# Altium PCB PCB-Thermostat.PcbDoc (part 3 of 4)
Units mil, origin at the board's own origin, x right, y up, seen from the top; angles counter-clockwise.
Board outline 3937.01 x 3543.31 mil, 4 copper layers (Top, PWR, GND, Bottom), stack 62.417 mil thick; 123 components, 131 nets, 527 pads, 279 vias.
Unrouted connection lines stored in the file: 2.
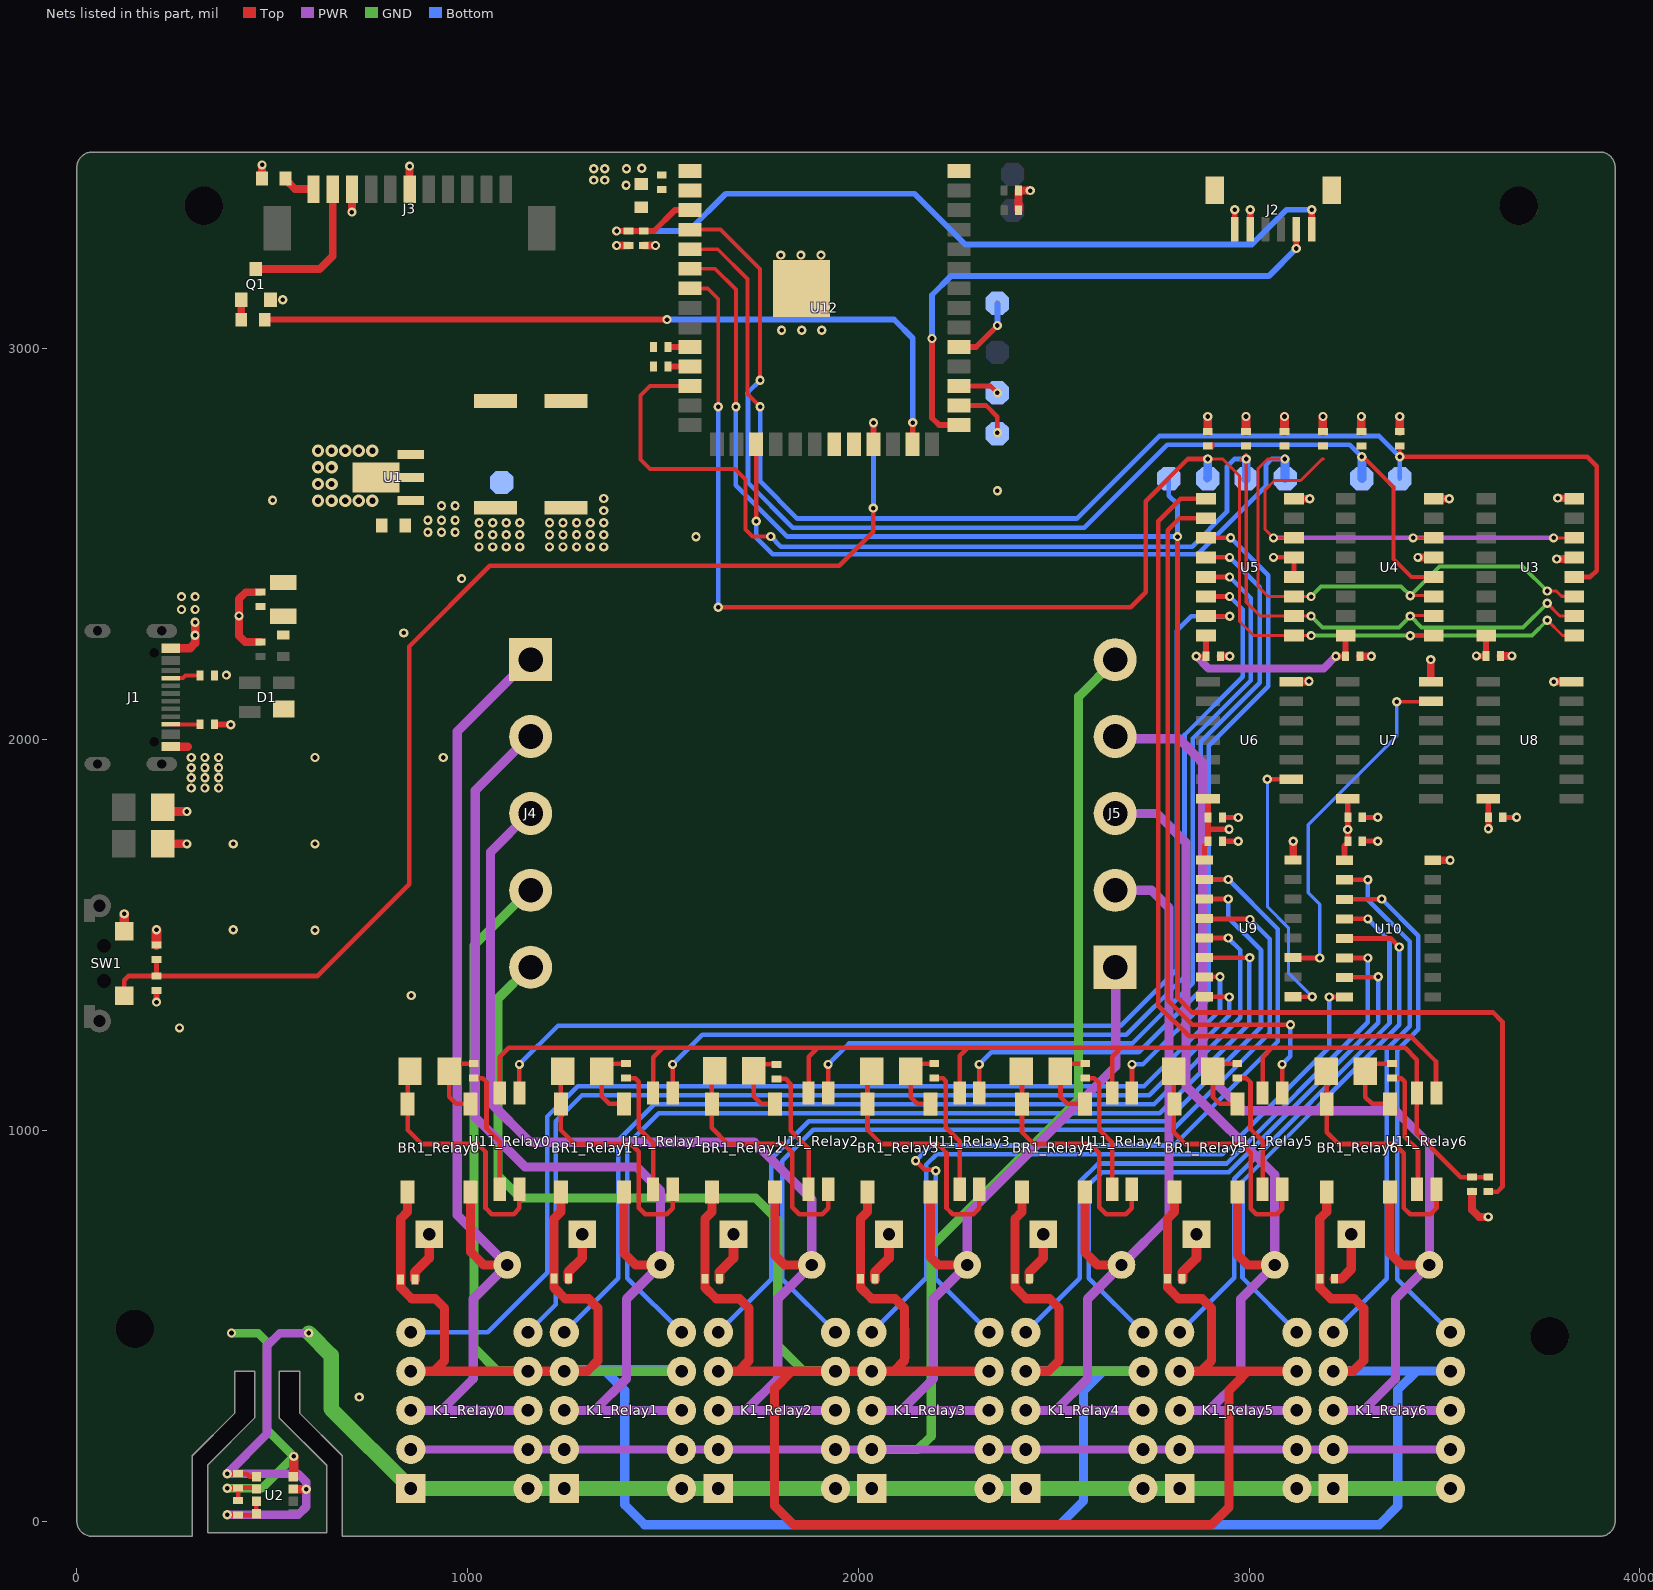
[diagram p4: the nets of this part, all layers, seen from the top]

## Via types
v1: diameter 23.62, hole 11.81, Top to Bottom, 261 vias
v2: diameter 31.5, hole 15.75, Top to Bottom, 14 vias
v3: diameter 23.62, hole 11.81, Top to Bottom, tented top, 4 vias

## Nets (pads, with @x,y where several pads share a name; then routed paths per layer and width w, separated by ;. In a path a pad name is that pad's centre, name@x,y a point inside that pad or via, vN(x,y) a via of type N, cw(c..) or ccw(c..) an arc to the next point about the centre after c; other vN are vias at no path point)
+3V3: C5.1 C6.1 C7.1 C8.1 C9.1 C10.1 C11.1 C12.1 C13.1 C14.1 C15.1 C16.1 C19.1 C20.1 J2.1 J3.3 K1_Relay0.1 K1_Relay0.10 K1_Relay1.1 K1_Relay1.10 K1_Relay2.1 K1_Relay2.10 K1_Relay3.1 K1_Relay3.10 K1_Relay4.1 K1_Relay4.10 K1_Relay5.1 K1_Relay5.10 K1_Relay6.1 K1_Relay6.10 P1.1 R4.2 R5.2 R6.2 R7.2 R8.2 R9.2 R10.2 R14.2 R15.2 R16.2 R19.2 R20.2 U1.3 U2.2 U2.5 U2.6 U2.8 U3.16 U4.16 U5.16 U6.14 U7.14 U8.14 U9.9 U10.9 U12.2 | length 6037.2
  Top w8: v1(384.64,16.13) v1@385.14,15.63 ; v1@384.64,120.13 v1@385.48,120.96 ; C7.1@411.8,120.96 C7.1@412.64,121.8 ; C8.1@412.14,15.63 C8.1@412.64,15.13
  Top w11.81: v1@385.14,15.63 C8.1@412.14,15.63 ; v1@385.48,120.96 C7.1@411.8,120.96 ; C8.1@412.64,15.13 455.64,15.13 U2.5@459.39,18.88 U2.6@459.39,50.38 ; C7.1@412.64,121.8 413.44,121 434.77,121 442.39,113.37 U2.8@459.39,113.37 U2.8@455.37,117.4
  Top w15: v3(2864.94,2213.13) C9.1@2889.94,2213.13 U5.16@2889.94,2266.29 ; U9.9@2886.59,1692.09 2886.59,1727.55 2895.45,1736.41 C15.1@2895.45,1739.91 2895.45,1770.25 ; U6.14@2895.45,1848.38 C12.1@2895.45,1800.6 2895.45,1770.25 ; v1(2948.96,1770.58) 2895.77,1770.58 2895.45,1770.25 ; J2.1@2963.57,3306.67 v1(2963.57,3356.37) ; v3(3222.29,2213.13) C10.1@3247.29,2213.13 U4.16@3247.29,2266.29 ; U10.9@3243.95,1691.09 3243.95,1727.77 3252.81,1736.63 C16.1@3252.81,1740.13 v1(3252.81,1769.81) C13.1@3252.81,1801.13 U7.14@3252.81,1848.38 ; v3(3581.94,2214.16) C11.1@3606.95,2214.16 U3.16@3606.94,2266.29 ; U8.14@3612.45,1848.38 C14.1@3612.45,1801.13 3612.54,1801.03 v1@3612.54,1772.22
  Top w16: v1(203.64,1328.13) R19.2@203.64,1357.83
  Top w19.68: v1(1381.37,3264.63) R14.2@1411.64,3264.63
  Top w20: R20.2@474,3436 v1(474,3471) ; v1(703.94,3350.06) J3.3@703.94,3409 ; R15.2@2410.14,3355.12 R16.2@2410.14,3405.12 v1(2439.9,3405.12) ; R10.2@3570.64,843.02 3570.64,796.46 3588.65,778.45 v1(3612.45,778.45)
  Top w22: U2.2@563.63,81.68 v1@587.06,81.68 ; R5.2@2894.64,2788.47 v1(2894.64,2826.88) ; R6.2@2992.37,2788.47 v1(2992.37,2826.88) ; R7.2@3090.8,2788.47 v1(3090.8,2826.88) ; R4.2@3189.22,2788.47 v1(3189.22,2826.88) ; R9.2@3287.65,2788.47 v1(3287.65,2826.88) ; R8.2@3386.07,2788.47 v1(3386.07,2826.88)
  PWR w20: v3(2864.94,2213.13) 2896.13,2181.94 3191.1,2181.94 v3(3222.29,2213.13)
  PWR w22: v1@385.08,16.13 385.39,16.44 566.95,16.44 587.13,36.61 v1(587.13,81.62) 586.82,81.93 586.82,99.95 565.64,121.13 v1(384.64,121.13) 486.22,222.71 486.22,447.75 519.6,481.13 v1(593.64,481.13)
  GND w39.37: v1(593.64,481.13) 650.64,424.13 650.64,287.13 K1_Relay0.1@854.64,83.13 K1_Relay0.10@1154.64,83.13 K1_Relay1.1@1247.64,83.13 K1_Relay1.10@1547.64,83.13 K1_Relay2.1@1641.64,83.13 K1_Relay2.10@1941.64,83.13 K1_Relay3.1@2034.64,83.13 K1_Relay3.10@2334.64,83.13 K1_Relay4.1@2428.64,83.13 K1_Relay4.10@2728.64,83.13 K1_Relay5.1@2822.64,83.13 K1_Relay5.10@3122.64,83.13 K1_Relay6.1@3215.64,83.13 K1_Relay6.10@3515.64,83.13
  Bottom w15: v3(3581.94,2214.16) v3@3583.24,2212.86
  other v1: 3612.64,1772.13 1029.36,2493.25 1064.11,2493.25 1098.86,2493.25 1133.61,2493.25 1029.36,2524.25 1064.11,2524.25 1098.86,2524.25 1133.61,2524.25 1029.36,2555.25 1064.11,2555.25 1098.86,2555.25 1133.61,2555.25 1323,3432.13 1351,3432.13 1323,3461.13 1351,3461.13
+5V: C4.1 F1.2 U1.2
  other v2: 617.22,2611.52 651.97,2611.52 686.72,2611.52 721.47,2611.52 756.22,2611.52 617.22,2654.18 651.97,2654.18 617.22,2696.85 651.97,2696.85 617.22,2739.52 651.97,2739.52 686.72,2739.52 721.47,2739.52 756.22,2739.52
B: BR1_Relay3.4 J5.1 K1_Relay3.3 K1_Relay3.8 RV1_Relay3.2 | length 1931.1
  Top w23.62: BR1_Relay3.4@2184.75,842.63 2184.75,675.01 2204.38,655.39 RV1_Relay3.2@2278.64,655.39 RV1_Relay3.2@2278.64,655.17
  PWR w23.62: K1_Relay3.3@2034.64,283.13 2135.55,283.13 K1_Relay3.8@2334.64,283.13 ; 2110.64,283.13 2191.64,364.13 2191.64,568.39 RV1_Relay3.2@2278.64,655.39 2278.64,783.73 2658.64,1163.73 J5.1@2658.64,1417.43
BLA: J3.1 R20.1 | length 84.2
  Top w20: R20.1@534,3436 534,3433.5 558.5,3409 J3.1@605.51,3409
BLK: J3.2 Q1.3 | length 381.8
  Top w20: Q1.3@458,3204.37 621.26,3204.37 654.72,3237.83 J3.2@654.72,3409
BR1_Relay0: BR1_Relay0.1 C17_Relay0.2 R13_Relay0.2 | length 196.1
  Top w11.81: BR1_Relay0.1@1007.75,1067.83 970.87,1067.83 952.64,1086.06 C17_Relay0.2@952.64,1151.13 972.14,1170.63 R13_Relay0.2@1012.93,1170.63
BR1_Relay1: BR1_Relay1.1 C17_Relay1.2 R13_Relay1.2 | length 198.9
  Top w11.81: BR1_Relay1.1@1400.46,1067.83 1363,1067.83 1343.64,1087.19 C17_Relay1.2@1343.64,1151.13 1363.14,1170.63 R13_Relay1.2@1405.64,1170.63
BR1_Relay2: BR1_Relay2.1 C17_Relay2.2 R13_Relay2.2 | length 192.1
  Top w11.81: BR1_Relay2.1@1786.75,1067.83 1751.73,1067.83 1732.64,1086.92 C17_Relay2.2@1732.64,1152.13 1749.14,1168.63 R13_Relay2.2@1790.64,1168.63
BR1_Relay3: BR1_Relay3.1 C17_Relay3.2 R13_Relay3.2 | length 193.3
  Top w11.81: BR1_Relay3.1@2184.75,1067.83 2151.38,1067.83 2134.64,1084.57 C17_Relay3.2@2134.64,1151.13 2134.64,1153.89 2151.38,1170.63 R13_Relay3.2@2194.64,1170.63
BR1_Relay4: BR1_Relay4.1 C17_Relay4.2 R13_Relay4.2 | length 207
  Top w11.81: BR1_Relay4.1@2580.46,1067.83 2534.97,1067.83 2517.64,1085.16 2517.64,1151.13 2537.14,1170.63 R13_Relay4.2@2580.64,1170.63
BR1_Relay5: BR1_Relay5.1 C17_Relay5.2 R13_Relay5.2 | length 205.8
  Top w11.81: R13_Relay5.2@2969.64,1170.63 2927.43,1170.63 2907.93,1151.13 2907.93,1085.16 2925.26,1067.83 BR1_Relay5.1@2970.75,1067.83
BR1_Relay6: BR1_Relay6.1 C17_Relay6.2 R13_Relay6.2 | length 212
  Top w11.81: BR1_Relay6.1@3360.46,1067.83 3314.97,1067.83 3297.64,1085.16 C17_Relay6.2@3297.64,1151.13 3317.14,1170.63 R13_Relay6.2@3365.64,1170.63
BR2_Relay0: BR1_Relay0.2 C17_Relay0.1 U11_Relay0.2 | length 667.8
  Top w11.81: C17_Relay0.1@852.64,1151.13 846.33,1144.82 846.33,1000.93 882.17,965.1 1025.66,965.1 1045.88,944.88 1045.88,801.33 1062.08,785.13 1117.69,785.13 1132.64,800.08 U11_Relay0.2@1132.64,849.13
BR2_Relay1: BR1_Relay1.2 C17_Relay1.1 U11_Relay1.2 | length 667.8
  Top w11.81: C17_Relay1.1@1244.75,1151.13 1238.45,1144.82 1238.45,1000.93 1274.28,965.1 1417.77,965.1 1437.99,944.88 1437.99,801.33 1454.2,785.13 1509.8,785.13 1524.75,800.08 U11_Relay1.2@1524.75,849.13
BR2_Relay2: BR1_Relay2.2 C17_Relay2.1 U11_Relay2.2 | length 674.6
  Top w11.81: C17_Relay2.1@1632.64,1152.13 1625.33,1144.82 BR1_Relay2.2@1625.33,1067.83 1625.33,1006.1 1666.33,965.1 1807.84,965.1 1830.52,942.42 1830.52,803.57 1848.97,785.13 1907.8,785.13 1922.75,800.08 U11_Relay2.2@1922.75,849.13
BR2_Relay3: BR1_Relay3.2 C17_Relay3.1 U11_Relay3.2 | length 666.3
  Top w11.81: C17_Relay3.1@2029.75,1151.13 2023.45,1144.82 2023.45,1000.93 2059.28,965.1 2202.77,965.1 2225.81,942.06 2225.81,801.19 2241.88,785.13 2294.8,785.13 2309.75,800.08 U11_Relay3.2@2309.75,849.13
BR2_Relay4: BR1_Relay4.2 C17_Relay4.1 U11_Relay4.2 | length 670.3
  Top w11.81: C17_Relay4.1@2419.04,1161.54 BR1_Relay4.2@2419.04,1067.83 2419.04,995.34 2449.28,965.1 2592.77,965.1 2616.64,941.24 2616.64,802.91 2634.42,785.13 2684.8,785.13 2699.75,800.08 U11_Relay4.2@2699.75,849.13
BR2_Relay5: BR1_Relay5.2 C17_Relay5.1 U11_Relay5.2 | length 660.2
  Top w11.81: C17_Relay5.1@2807.64,1151.13 2807.64,994.63 2837.17,965.1 2981.64,965.1 3004.28,942.46 3004.28,799.19 3018.34,785.13 3070.89,785.13 3084.75,798.99 U11_Relay5.2@3084.75,849.13
BR2_Relay6: BR1_Relay6.2 C17_Relay6.1 U11_Relay6.2 | length 660.3
  Top w11.81: C17_Relay6.1@3199.04,1150.42 3199.04,995.34 3229.28,965.1 3372.77,965.1 3396.44,941.44 3396.44,801.15 3412.47,785.13 3464.8,785.13 3479.75,800.08 U11_Relay6.2@3479.75,849.13
C: J5.5 K1_Relay0.2 K1_Relay0.9 K1_Relay1.2 K1_Relay1.9 K1_Relay2.2 K1_Relay2.9 K1_Relay3.2 K1_Relay3.9 K1_Relay4.2 K1_Relay4.9 K1_Relay5.2 K1_Relay5.9 K1_Relay6.2 K1_Relay6.9 | length 5010.5
  PWR w20: K1_Relay0.2@854.64,183.13 K1_Relay0.9@1154.64,183.13 K1_Relay1.2@1247.64,183.13 K1_Relay1.9@1547.64,183.13 K1_Relay2.2@1641.64,183.13 K1_Relay2.9@1941.64,183.13 K1_Relay3.2@2034.64,183.13 K1_Relay3.9@2334.64,183.13 K1_Relay4.2@2428.64,183.13 K1_Relay4.9@2728.64,183.13 K1_Relay5.2@2822.64,183.13 K1_Relay5.9@3122.64,183.13 K1_Relay6.9@3515.64,183.13
  GND w23.62: K1_Relay3.2@2034.64,183.13 2152.99,183.13 2186.64,216.78 2186.64,702.13 2563.91,1079.4 2563.91,2110.1 J5.5@2658.64,2204.83
CS: P13.1 U12.31 | length 177.6
  Top w15: U12.31@2257.87,3005.12 2301.12,3005.12 v1(2356,3060)
  Bottom w15: P13.1@2355.65,3116.64 2355.82,3116.47 2355.82,3060.18 v1(2356,3060)
E3: R4.1 U3.6 U4.6 U5.6 | length 1187.5
  Top w8: U5.6@3115.14,2516.29 v1(3062.65,2516.29) 3041.32,2537.62 3041.32,2639.13 3065.32,2663.13 3132.22,2663.13 3187.41,2718.32 3189.91,2718.32 ; v1(3420,2516.29) U4.6@3472.49,2516.29 ; v1(3779.65,2516.29) U3.6@3832.14,2516.29
  PWR w12: v1(3062.65,2516.29) v1(3420,2516.29) v1(3779.65,2516.29)
EN_ESP: C18.2 J2.6 R14.1 U12.3 | length 2171.1
  Top w15: v1(1381.37,3301.63) R14.1@1411.64,3301.63 C18.2@1450.64,3301.63 1477.05,3301.63 1530.54,3355.12 U12.3@1568.9,3355.12 U12.3@1567.27,3356.75
  Top w16: J2.6@3160.43,3306.67 v1(3160.43,3356.32)
  Bottom w15: v1(1381.37,3301.63) 1565.59,3301.63 1661.03,3397.07 2143.88,3397.07 2273.97,3266.97 3006.86,3266.97 3096.21,3356.32 v1(3160.43,3356.32)
ESP_RXD: R18.2
ESP_TXD: R17.2
G: BR1_Relay1.4 J4.2 K1_Relay1.3 K1_Relay1.8 RV1_Relay1.2 | length 2778.1
  Top w23.62: BR1_Relay1.4@1400.46,842.63 1400.46,685.31 1430.38,655.39 RV1_Relay1.2@1493.64,655.39
  PWR w23.62: J4.2@1157.64,2007.98 1019.64,1869.98 1019.64,1033.58 1147.21,906.02 1432.75,906.02 1493.64,845.13 RV1_Relay1.2@1493.64,655.39 1406.64,568.39 1406.64,364.13 1325.64,283.13 ; K1_Relay1.3@1247.64,283.13 K1_Relay1.8@1547.64,283.13
GND: C1.2 C2.2 C3.2 C4.2 C5.2 C6.2 C7.2 C8.2 C9.2 C10.2 C11.2 C12.2 C13.2 C14.2 C15.2 C16.2 C18.1 C19.2 C20.2 C21.2 D1.1 J1.A1/B12 J1.B1/A12 J2.2 J2.MP1 J2.MP2 J3.6 Q1.2 R1.1 R2.1 R3.1 SW1.2 U1.1 U2.1 U2.7 U3.5 U3.8 U4.5 U4.8 U5.4 U5.5 U5.8 U6.7 U7.7 U8.7 U9.8 U10.8 U12.1 U12.40 U12.41 | length 2405.1
  Top w8: U3.5@3827.97,2462.13 U3.5@3832.14,2466.29 ; U3.8@3830.3,2618.13 U3.8@3832.14,2616.29
  Top w11.81: v1(384.64,84.13) 384.98,84.46 412.3,84.46 C7.2@412.64,84.8 ; C8.2@412.64,52.13 C7.2@412.64,84.8 ; U2.7@459.39,81.87 456.47,84.8 C7.2@412.64,84.8 ; v1(3062.65,2466.29) U5.5@3115.14,2466.29 U5.4@3115.14,2416.29 ; U7.7@3444.07,2148.38 3458.73,2148.38 U7.7@3464.64,2154.28 ; v1@3776.64,2146.13 v1@3777.76,2147.25 ; U8.7@3798.4,2148.38 3800.44,2148.38 3800.66,2148.17 U8.7@3800.66,2147.04 ; U8.7@3800.44,2147.25 U8.7@3800.66,2147.04 ; U8.7@3800.66,2146.13 U8.7@3800.66,2147.04
  Top w13: C15.2@2932.45,1739.91 v1(2972.64,1739.91) ; C12.2@2932.45,1800.6 v1(2972.64,1800.6) ; C16.2@3289.81,1740.13 v1(3329.38,1740.13) ; C13.2@3289.81,1801.13 v1(3329.38,1801.13) ; C14.2@3649.45,1801.13 v1(3684.89,1801.13)
  Top w16: R3.1@352.64,2039.13 353.26,2038.5 393.32,2038.5 v1(393.95,2037.87) ; J2.2@3002.94,3306.67 v1(3002.94,3356.32)
  Top w19.68: C18.1@1450.64,3264.63 v1(1480.9,3264.63) ; U6.7@3108.05,2148.38 3108.42,2148.75 3153.26,2148.75 v1(3153.64,2149.13) ; U9.8@3112.97,1694.06 v1(3112.97,1739.91) ; U5.8@3115.14,2616.29 v1(3155.29,2616.29) ; v1(3432.33,2466.29) U4.5@3472.49,2466.29 ; U7.7@3465.4,2148.38 v1(3465.4,2204.87) ; U10.8@3470.33,1691.09 v1(3514.64,1691.13) ; U4.8@3472.49,2616.29 v1(3512.65,2616.29) ; v1@3780.21,2148.38 U8.7@3798.4,2148.38 ; v1(3787.81,2462.13) U3.5@3827.97,2462.13 ; v1(3790.14,2618.13) U3.8@3830.3,2618.13 ; U8.7@3800.44,2148.38 U8.7@3825.05,2148.38
  Top w20: C3.2@470.08,2249.96 431.02,2249.96 414.96,2266.02 v1(414.96,2316.63) 414.96,2360.12 432.01,2377.17 469.92,2377.17 C2.2@470.08,2377.32 ; J3.6@851.57,3409 v1(851.57,3467.94) ; C9.2@2926.94,2213.13 v1(2950.91,2213.13) ; C10.2@3284.29,2213.13 v1(3313.24,2213.13) ; C11.2@3643.95,2214.16 v1(3672.88,2214.16)
  Top w22: R1.1@219.64,1733.13 v1(281.64,1733.13) ; C1.2@219.64,1847.13 C1.2@230.64,1836.13 ; C1.2@230.64,1816.13 v1(281.64,1816.13) ; J1.B1/A12@239.75,1982.12 283.65,1982.12 ; J1.A1/B12@239.75,2234.09 289.75,2234.11 302.64,2246.99 v1(302.64,2267.13) v1@302.64,2295.13
  Top w25: SW1.2@120.93,1514.03 v1(120.93,1553.96) ; C21.2@203.64,1474.13 v3(203.64,1513.13) ; U2.1@554.89,114.38 v1(554.89,165.37)
  GND w22: v1(384.64,84.13) 473.65,84.13 v1(554.89,165.37) 486.64,233.62 486.64,458.13 463.64,481.13 v1(395.67,481.13)
  other v1: 722.64,317.13 262.64,1262.13 855.64,1345.13 609.58,1512.13 400.46,1513.13 400.46,1733.13 609.58,1733.13 292.64,1876.13 327.64,1876.13 362.64,1876.13 292.64,1902.13 327.64,1902.13 362.64,1902.13 292.64,1928.13 327.64,1928.13 362.64,1928.13 292.64,1954.13 327.64,1954.13 362.64,1954.13 609.58,1954.13 937.64,1954.13 3779.84,2148 382.64,2165.13 836.64,2273.13 302.64,2300.13 267.64,2333.13 302.64,2333.13 267.64,2366.13 302.64,2366.13 984.64,2412.13 1209.56,2493.25 1244.31,2493.25 1279.06,2493.25 1313.81,2493.25 1348.56,2493.25 1584.64,2519.13 1209.56,2524.25 1244.31,2524.25 1279.06,2524.25 1313.81,2524.25 1348.56,2524.25 898.47,2530.52 933.22,2530.52 967.97,2530.52 1209.56,2555.25 1244.31,2555.25 1279.06,2555.25 1313.81,2555.25 1348.56,2555.25 898.47,2561.52 933.22,2561.52 967.97,2561.52 1348.56,2586.25 933.22,2598.52 967.97,2598.52 500.87,2612.65 1348.56,2617.25 2356,2637.13 1803.69,3047.99 1855.19,3047.99 1906.69,3047.99 527,3125.63 1801.64,3240.13 1853.14,3240.13 1904.64,3240.13 1405.64,3419.13 1406.64,3461.13 1445.64,3462.13
GPIO4: P5.1 R9.1 U4.4 U12.4 | length 2974.9
  Top w10: U12.4@1568.9,3305.12 1647.65,3305.12 1748.64,3204.13 v1(1748.64,2919.84) ; v1(3288.34,2724.13) 3291.65,2724.13 3369.64,2646.14 3369.64,2462.38 3415.73,2416.29 U4.4@3472.49,2416.29
  Bottom w12: v1(1748.64,2919.84) 1717.64,2888.84 1717.64,2657.13 1832.68,2542.08 2577.74,2542.08 2790.43,2754.76 3257.7,2754.76 v1(3288.34,2724.13)
  Bottom w22: P5.1@3289.07,2667.9 v1@3289.07,2722.95
GPIO5: P6.1 R8.1 U3.4 U12.5 | length 3412.2
  Top w10: U12.5@1568.9,3255.12 1640.36,3255.12 1716.54,3178.94 1716.54,2884.23 v1(1748.64,2852.13)
  Top w12: v1@3386.07,2729.28 v1(3386.07,2724.13) 3865.29,2724.13 3889.64,2699.78 3889.64,2432.7 3873.23,2416.29 U3.4@3832.14,2416.29 ; 3386.07,2736.13 3386.07,2734.44 v1@3391.23,2729.28
  Bottom w12: v1(1748.64,2852.13) 1748.64,2660.7 1843.65,2565.69 2559.42,2565.69 2770.58,2776.85 3333.35,2776.85 v1(3386.07,2724.13) P6.1@3386.07,2667.9
GPIO6: P7.1 R11.2 U12.6 | length 4470.9
  Top w10: U12.6@1568.9,3205.12 1633.65,3205.12 1686.64,3152.13 v1(1686.64,2852.13)
  Top w11.81: 2817.09,2506.25 2817.09,1338.95 2854.51,1301.53 3625.1,1301.53 3648.64,1277.99 3648.64,855.72 3635.94,843.02 R11.2@3612.45,843.02
  Bottom w12: v1(1686.64,2852.13) 1686.64,2651.13 1818.08,2519.68 v1(2817.09,2519.68) 2817.09,2601.91 2794.64,2624.36 P7.1@2794.64,2667.9
GPIO7: P2.1 R5.1 U3.1 U4.1 U5.1 U12.7 | length 3911.5
  Top w8: v1(2894.33,2718.32) 2932.9,2718.32 2975.68,2675.53 2975.68,2302.4 3011.79,2266.29 U5.1@3115.14,2266.29 ; U5.1@3115.3,2266.13 v1(3158.89,2266.13) ; v1(3412.85,2266.09) 3472.29,2266.09 U4.1@3472.49,2266.29 ; v1(3763.22,2305.46) 3802.39,2266.29 U3.1@3832.14,2266.29
  Top w10: U12.7@1568.9,3155.12 1614.65,3155.12 1641.64,3128.13 v1(1641.64,2852.13)
  Top w12: v1@1641.37,2338.58 v1(1641.64,2338.58) 2696.89,2338.58 2735.85,2377.54 2735.85,2610.34 2843.83,2718.32 v1(2894.33,2718.32) ; R5.1@2905.64,2749.13 R5.1@2905.64,2755.13
  GND w10: v1@3158.92,2266.09 v1(3412.85,2266.09) 3723.85,2266.09 v1(3763.22,2305.46)
  Bottom w12: v1(1641.64,2338.58) v1(1641.64,2852.13)
  Bottom w22: P2.1@2892.98,2669.24 2894.48,2670.74 2894.48,2718.16 v1(2894.33,2718.32)
GPIO8: P3.1 R6.1 U3.2 U4.2 U5.2 U12.12 | length 3613.8
  Top w8: v1(2993.06,2718.32) 2993.06,2351.7 3028.47,2316.29 U5.2@3115.14,2316.29 ; U5.2@3115.3,2316.13 v1(3158.89,2316.13) ; v1@3412.85,2317.28 3471.51,2317.28 U4.2@3472.49,2316.29 ; v1(3763.24,2348.77) 3795.72,2316.29 U3.2@3832.14,2316.29
  Top w10: U12.12@1568.9,2905.12 1467.01,2905.12 1442.64,2880.75 1442.64,2717.12 1466.93,2692.83 1684.17,2692.83 1711,2666 1711,2537.69 1728.69,2520 v1(1776,2520) ; 2980.37,2715.44 2980.37,2716.13 v1@2987.81,2723.57 ; v1@2992.37,2728.13 v1@2987.81,2723.57 ; v1(2993.06,2718.32) v1@2987.81,2723.57
  GND w10: v1(3158.89,2316.13) 3187.77,2287.25 3383.97,2287.25 v1(3412.85,2316.13) 3441.72,2287.25 3701.72,2287.25 v1(3763.24,2348.77)
  Bottom w12: v1(1776,2520) 1802.09,2493.91 2854.3,2493.91 2943.48,2583.09 2943.48,2698.84 2962.95,2718.32 v1(2993.06,2718.32)
  Bottom w22: P3.1@2993.06,2665.47 2990.64,2667.9 2992.85,2670.11 2992.85,2718.1 v1(2993.06,2718.32)
GPIO9: P4.1 R7.1 U3.3 U4.3 U5.3 U12.17 | length 3138
  Top w8: v1(3091.8,2718.32) 3047.72,2718.32 3022.86,2693.46 3022.86,2392.47 3049.04,2366.29 U5.3@3115.14,2366.29 3115.3,2366.13 v1(3158.89,2366.13) ; v1(3412.85,2368.46) 3470.33,2368.46 U4.3@3472.49,2366.29 ; v1(3763.24,2380.27) 3786.5,2380.27 3799.94,2366.83 3831.6,2366.83 U3.3@3832.14,2366.29
  Top w12: v1(1738.58,2559.06) U12.17@1738.58,2755.9
  GND w10: v1(3158.89,2366.13) 3184.74,2391.98 3389.33,2391.98 v1(3412.85,2368.46) 3487.51,2443.13 3700.38,2443.13 v1(3763.24,2380.27)
  Bottom w12: v1(1738.58,2559.06) 1738.58,2516.42 1780.91,2474.09 2868.24,2474.09 3043.71,2649.56 3043.71,2703.66 3058.37,2718.32 v1(3091.8,2718.32)
  Bottom w22: v1(3091.8,2718.32) 3092.11,2718 3092.11,2668.43 P4.1@3092.64,2667.9
GPIO13: U12.21
GPIO14: U12.22
GPIO21: C21.1 R19.1 SW1.1 U12.23 | length 3165.4
  Top w10: U12.23@2038.58,2755.9 U12.23@2038.95,2756.27
  Top w12: SW1.1@120.93,1344.53 120.93,1384.37 131.39,1394.83 R19.1@203.64,1394.83 ; C21.1@203.64,1437.13 R19.1@203.64,1394.83 ; v1(2038.29,2592.52) 2038.29,2531.91 1951.05,2444.66 1057.14,2444.66 850.76,2238.28 850.76,1630.24 615.34,1394.83 R19.1@203.64,1394.83
  Top w15: U12.23@2038.95,2756.27 v1(2038.95,2811.02)
  Bottom w12: v1@2038.95,2592.52 v1(2038.95,2811.02)
GPIO48: R21.1 U12.25 | length 1949.9
  Top w15: R21.1@480.6,3075 v1(1510.47,3075) ; U12.25@2139.35,2755.9 v1(2139.35,2811.42)
  Bottom w15: v1(1510.47,3075) 2091.59,3075 2139.35,3027.24 v1(2139.35,2811.42)
IO0: J2.5 U12.27 | length 1423
  Top w15: v1(2188.58,3026.58) 2188.58,2823.42 2206.88,2805.12 U12.27@2257.87,2805.12 ; v1(3121.06,3256.96) J2.5@3121.06,3306.67
  Bottom w15: v1(2188.58,3026.58) 2188.58,3138.09 2236.66,3186.17 3050.26,3186.17 v1(3121.06,3256.96)
MISO: P11.1 U12.29 | length 105.5
  Top w12: U12.29@2257.87,2905.12 2338.28,2905.12 v1(2356,2887.4)
MOSI: P10.1 U12.28 | length 151.2
  Top w12: U12.28@2257.87,2855.12 2327.67,2855.12 2356,2826.79 v1(2356,2785.43)
NetC2_1: C2.1 F1.1 FB1.2
NetJ1_A5: J1.A5 R2.2 | length 78.7
  Top w10: J1.A5@239.75,2157.31 271.09,2157.31 277.9,2164.13 R2.2@315.64,2164.13
NetJ1_B5: J1.B5 R3.2 | length 75.9
  Top w10: J1.B5@239.75,2039.2 239.79,2039.17 315.6,2039.17 R3.2@315.64,2039.13
NetQ1_1: Q1.1 R21.2 | length 50.6
  Top w20: R21.2@420.6,3075 Q1.1@420.6,3125.63
NetR12_Relay0_1: R12_Relay0.1 RV1_Relay0.1 | length 130.9
  Top w25: R12_Relay0.1@865.62,618.13 865.62,636.84 901.64,672.86 RV1_Relay0.1@901.64,734.13
NetR12_Relay1_1: R12_Relay1.1 RV1_Relay1.1 | length 130.9
  Top w25: R12_Relay1.1@1257.62,618.13 1257.62,636.84 1293.64,672.86 RV1_Relay1.1@1293.64,734.13
NetR12_Relay2_1: R12_Relay2.1 RV1_Relay2.1 | length 130.9
  Top w25: R12_Relay2.1@1644.62,618.13 1644.62,636.84 1680.64,672.86 RV1_Relay2.1@1680.64,734.13
NetR12_Relay3_1: R12_Relay3.1 RV1_Relay3.1 | length 130.9
  Top w25: R12_Relay3.1@2042.62,618.13 2042.62,636.84 2078.64,672.86 RV1_Relay3.1@2078.64,734.13
NetR12_Relay4_1: R12_Relay4.1 RV1_Relay4.1 | length 130.9
  Top w25: R12_Relay4.1@2437.62,618.13 2437.62,636.84 2473.64,672.86 RV1_Relay4.1@2473.64,734.13
NetR12_Relay5_1: R12_Relay5.1 RV1_Relay5.1 | length 130.9
  Top w25: R12_Relay5.1@2829.62,618.13 2829.62,636.84 2865.64,672.86 RV1_Relay5.1@2865.64,734.13
NetR12_Relay6_1: R12_Relay6.1 RV1_Relay6.1 | length 142.9
  Top w25: R12_Relay6.1@3218.33,619.95 3236.71,619.95 3261.64,644.88 RV1_Relay6.1@3261.64,734.13
NetR13_Relay0_1: R13_Relay0.1 U11_Relay0.1 | length 326
  Top w11.81: R13_Relay0.1@1015.64,1133.63 1039.14,1133.63 1048.33,1124.43 1048.33,1004.84 1082.64,970.53 U11_Relay0.1@1082.64,849.13
NetR13_Relay1_1: R13_Relay1.1 U11_Relay1.1 | length 326.9
  Top w11.81: R13_Relay1.1@1405.64,1133.63 1429.14,1133.63 1438.33,1124.43 1438.33,1004.84 1474.75,968.42 U11_Relay1.1@1474.75,849.13
NetR13_Relay2_1: R13_Relay2.1 U11_Relay2.1 | length 330.3
  Top w11.81: R13_Relay2.1@1790.64,1131.63 1814.14,1131.63 1827.45,1118.32 1827.45,998.72 1872.75,953.42 U11_Relay2.1@1872.75,849.13
NetR13_Relay3_1: R13_Relay3.1 U11_Relay3.1 | length 324.2
  Top w11.81: R13_Relay3.1@2194.64,1133.63 2195.25,1133.01 2216.96,1133.01 2223.87,1126.09 2223.87,1008.29 2259.75,972.42 U11_Relay3.1@2259.75,849.13
NetR13_Relay4_1: R13_Relay4.1 U11_Relay4.1 | length 326.9
  Top w11.81: R13_Relay4.1@2580.64,1133.63 2604.14,1133.63 2616.6,1121.17 2616.6,1001.57 2649.75,968.42 U11_Relay4.1@2649.75,849.13
NetR13_Relay5_1: R13_Relay5.1 U11_Relay5.1 | length 325.2
  Top w11.81: R13_Relay5.1@2969.64,1133.63 2993.14,1133.63 3003.86,1122.91 3003.86,1003.31 3034.75,972.42 U11_Relay5.1@3034.75,849.13
NetR13_Relay6_1: R13_Relay6.1 U11_Relay6.1 | length 326
  Top w11.81: R13_Relay6.1@3365.64,1133.63 3389.14,1133.63 3398.33,1124.43 3398.33,982.87 3432.64,948.56 U11_Relay6.1@3432.64,849.13
NetR17_1: R17.1 U12.10 | length 56.3
  Top w15: R17.1@1512.64,3005.12 U12.10@1568.9,3005.12
NetR18_1: R18.1 U12.11 | length 56.3
  Top w15: R18.1@1512.64,2955.12 U12.11@1568.9,2955.12
O: BR1_Relay4.4 J5.2 K1_Relay4.3 K1_Relay4.8 RV1_Relay4.2 | length 2123.5
  Top w23.62: BR1_Relay4.4@2580.46,842.63 2580.46,687.31 2612.38,655.39 RV1_Relay4.2@2673.64,655.39
  PWR w23.62: K1_Relay4.3@2428.64,283.13 2528.07,283.13 K1_Relay4.8@2728.64,283.13 ; 2505.64,283.13 2586.64,364.13 2586.64,568.39 RV1_Relay4.2@2673.64,655.39 2795.52,777.27 2795.52,1569.24 2750.49,1614.28 2659.64,1614.28 J5.2@2658.64,1614.28
RC: BR1_Relay0.3 BR1_Relay1.3 BR1_Relay4.3 BR1_Relay6.3 J4.4 K1_Relay0.4 K1_Relay0.7 K1_Relay1.4 K1_Relay1.7 K1_Relay4.4 K1_Relay4.7 K1_Relay6.4 K1_Relay6.7 R12_Relay0.2 R12_Relay1.2 R12_Relay4.2 R12_Relay6.2 | length 8876.8
  Top w23.62: BR1_Relay0.3@846.33,842.63 846.33,791.58 828.62,773.86 828.62,597.6 857.34,568.88 916.88,568.88 941.22,544.54 941.22,410.96 913.39,383.13 ; K1_Relay0.4@854.64,383.13 913.39,383.13 ; BR1_Relay1.3@1239.04,842.63 1239.04,791.58 1221.33,773.86 1221.33,597.6 1250.05,568.88 1309.59,568.88 1333.93,544.54 1333.93,410.96 1306.1,383.13 K1_Relay1.4@1247.64,383.13 K1_Relay0.7@1154.64,383.13 913.39,383.13 ; BR1_Relay4.3@2419.04,842.63 2419.04,791.58 2401.33,773.86 2401.33,597.6 2430.05,568.88 2489.59,568.88 2513.93,544.54 2513.93,410.96 2486.1,383.13 ; K1_Relay4.4@2428.64,383.13 2481.91,383.13 ; BR1_Relay6.3@3199.04,842.63 3199.04,791.58 3181.33,773.86 3181.33,597.6 3210.05,568.88 3269.59,568.88 3293.93,544.54 3293.93,410.96 3266.1,383.13 K1_Relay6.4@3215.64,383.13
  GND w23.62: K1_Relay0.7@1154.64,383.13 1076.64,383.13 1016.64,443.13 1016.64,1473.28 J4.4@1157.64,1614.28 ; K1_Relay1.4@1247.64,383.13 K1_Relay1.7@1547.64,383.13 ; K1_Relay4.4@2428.64,383.13 K1_Relay4.7@2728.64,383.13
  Bottom w23.62: K1_Relay1.4@1245.58,387.63 1348.84,387.63 ; K1_Relay1.7@1545.58,387.63 1348.84,387.63 ; K1_Relay4.4@2428.64,383.13 2626.3,383.13 ; K1_Relay4.7@2728.64,383.13 2626.3,383.13 ; K1_Relay6.4@3216.58,384.07 3429.04,384.07 ; K1_Relay6.7@3514.69,384.07 3429.04,384.07 ; 1348.84,387.63 1402.24,334.23 1402.24,41.48 1453.03,-9.31 2515.58,-9.31 ; 2515.58,-9.31 2576.65,51.77 2576.65,333.48 2626.3,383.13 ; 2515.58,-9.31 3332.95,-9.31 3380.64,38.38 3380.64,335.67 3429.04,384.07
RELAY_IN_Relay2: BR1_Relay2.3 BR1_Relay3.3 BR1_Relay5.3 J4.5 K1_Relay2.4 K1_Relay2.7 K1_Relay3.4 K1_Relay3.7 K1_Relay5.4 K1_Relay5.7 R12_Relay2.2 R12_Relay3.2 R12_Relay5.2 | length 6504
  Top w23.62: BR1_Relay2.3@1625.33,842.63 1625.33,791.58 1607.62,773.86 R12_Relay2.2@1607.62,619.95 1607.62,597.6 1636.34,568.88 1695.88,568.88 1720.22,544.54 1720.22,410.96 1692.39,383.13 ; K1_Relay2.4@1641.64,383.13 1692.39,383.13 ; BR1_Relay3.3@2023.33,844.63 BR1_Relay3.3@2023.33,842.63 2023.33,791.58 2005.62,773.86 2005.62,597.6 2034.34,568.88 2093.88,568.88 2118.22,544.54 2118.22,410.96 2090.39,383.13 ; 2118.64,418.62 2118.64,491.13 ; K1_Relay3.7@2334.64,383.13 2083.14,383.13 K1_Relay3.4@2034.64,383.13 K1_Relay2.7@1941.64,383.13 1830.06,383.13 ; BR1_Relay5.3@2809.33,842.63 2809.33,791.58 2791.62,773.86 2791.62,597.6 2820.34,568.88 2879.88,568.88 2904.22,544.54 2904.22,410.96 2876.39,383.13 ; K1_Relay5.4@2822.64,383.13 2891.57,383.13 2997.04,383.13 ; K1_Relay5.7@3122.64,383.13 2997.04,383.13 ; 1692.39,383.13 1830.06,383.13 ; 1830.06,383.13 1785.65,338.72 1785.65,39.22 1833.75,-8.87 2904.56,-8.87 2948.83,35.4 2948.83,334.92 2997.04,383.13
  GND w23.62: J4.5@1157.64,1417.43 1077.64,1337.43 1077.64,884.13 1134.64,827.13 1736.64,827.13 1793.64,770.13 1793.64,450.13 1860.65,383.13 K1_Relay2.7@1941.64,383.13
RELAY_O0: BR1_Relay0.4 J4.1 K1_Relay0.3 K1_Relay0.8 RV1_Relay0.2 | length 2681.8
  Top w23.62: BR1_Relay0.4@1007.75,842.63 1007.75,689.24 1041.61,655.39 RV1_Relay0.2@1101.64,655.39
  PWR w23.62: K1_Relay0.3@854.64,283.13 933.64,283.13 ; K1_Relay0.8@1154.64,283.13 933.64,283.13 ; J4.1@1157.64,2204.83 973.64,2020.83 973.64,783.39 RV1_Relay0.2@1101.64,655.39 1014.64,568.39 1014.64,364.13 933.64,283.13
RELAY_O2: BR1_Relay2.4 J4.3 K1_Relay2.3 K1_Relay2.8 RV1_Relay2.2 | length 2881.7
  Top w23.62: BR1_Relay2.4@1786.75,842.63 1786.75,680.01 1811.38,655.39 RV1_Relay2.2@1880.64,655.39
  PWR w23.62: J4.3@1157.64,1811.13 1058.64,1712.13 1058.64,1071.21 1160.31,969.54 1733.8,969.54 1880.64,822.7 RV1_Relay2.2@1880.64,655.39 1793.64,568.39 1793.64,364.13 1712.64,283.13 ; K1_Relay2.3@1641.64,283.13 K1_Relay2.8@1941.64,283.13
RELAY_O5: BR1_Relay5.4 J5.3 K1_Relay5.3 K1_Relay5.8 RV1_Relay5.2 | length 2394.8
  Top w23.62: BR1_Relay5.4@2970.75,842.63 2970.75,681.01 2996.38,655.39 RV1_Relay5.2@3065.64,655.39
  PWR w23.62: J5.3@2658.64,1811.13 2659.64,1811.13 2763.64,1811.13 2838.64,1736.13 2838.64,1113.13 3065.64,886.13 RV1_Relay5.2@3065.64,655.39 2978.64,568.39 2978.64,364.13 2897.64,283.13 ; K1_Relay5.3@2822.64,283.13 2919.82,283.13 K1_Relay5.8@3122.64,283.13
RELAY_O6: BR1_Relay6.4 J5.4 K1_Relay6.3 K1_Relay6.8 RV1_Relay6.2 | length 3033.3
  Top w23.62: BR1_Relay6.4@3360.46,842.63 3360.46,686.09 3391.16,655.39 RV1_Relay6.2@3461.64,655.39
  PWR w23.62: J5.4@2658.64,2007.98 2664.49,2002.13 2820.64,2002.13 2881.64,1941.13 2881.64,1154.13 2985.64,1050.13 3375.64,1050.13 3461.64,964.13 RV1_Relay6.2@3461.64,655.39 3374.64,568.39 3374.64,364.13 3293.64,283.13 ; K1_Relay6.3@3199.75,287.63 K1_Relay6.3@3215.64,287.63 ; K1_Relay6.3@3215.64,283.13 K1_Relay6.8@3515.64,283.13
RELAY_RESET_Relay0: K1_Relay0.6 U9.16 | length 2515.5
  Top w11.81: U9.16@2886.62,1342.13 2887.14,1341.61 2949.15,1341.61 v1(2949.64,1341.13)
  Bottom w11.81: K1_Relay0.6@1154.64,483.13 1225.64,554.13 1225.64,1022.89 1292.87,1090.13 2744.93,1090.13 2949.64,1294.84 v1(2949.64,1341.13)
RELAY_RESET_Relay1: K1_Relay1.6 U9.14 | length 2541.2
  Top w11.81: U9.14@2886.61,1442.11 v1@3000.62,1442.11
  Bottom w11.81: K1_Relay1.6@1547.64,483.13 1408.94,621.83 1408.94,963.75 1489.32,1044.13 2771.96,1044.13 3000.64,1272.8 v1@3000.64,1442.13
  other v1: 3001.64,1442.13
RELAY_RESET_Relay2: K1_Relay2.6 U9.12 | length 2306
  Top w11.81: U9.12@2886.59,1542.09 2887.81,1540.88 3001.43,1540.88 v1(3002.65,1539.67)
  Bottom w11.81: K1_Relay2.6@1941.64,483.13 1805.81,618.95 1805.81,922.3 1884.64,1001.13 2804.7,1001.13 3052.64,1249.06 3052.64,1489.68 v1(3002.65,1539.67)
RELAY_RESET_Relay3: K1_Relay3.6 U9.10 | length 2113.4
  Top w11.81: v1(2146.64,922.13) 2169.92,898.84 2195.84,898.84 v1(2198.1,896.58) ; U9.10@2886.59,1642.09 v1(2947.03,1642.09)
  Bottom w11.81: v1(2146.64,922.13) 2185.64,961.13 2807.64,961.13 3073.88,1227.37 3073.88,1515.24 v1(2947.03,1642.09) ; v1(2198.1,896.58) 2198.1,619.67 K1_Relay3.6@2334.64,483.13
RELAY_RESET_Relay4: K1_Relay4.6 U10.15 | length 1552.6
  Top w11.81: U10.15@3243.95,1391.09 3244.96,1392.11 3329.62,1392.11 v1(3330.64,1393.13)
  Bottom w11.81: K1_Relay4.6@2728.64,483.13 2590.09,621.68 2590.09,860.46 2622.75,893.13 2948.64,893.13 3330.64,1275.13 v1(3330.64,1393.13)
RELAY_RESET_Relay5: K1_Relay5.6 U10.13 | length 1359.6
  Top w11.81: U10.13@3243.95,1491.09 3362.67,1491.09 v1(3384.64,1469.13)
  Bottom w11.81: K1_Relay5.6@3122.64,483.13 2983.43,622.34 2983.43,868.91 3384.64,1270.13 v1(3384.64,1469.13)
RELAY_RESET_Relay6: K1_Relay6.6 U10.11 | length 1322.9
  Top w11.81: U10.11@3243.95,1591.09 3244.46,1591.61 3339.12,1591.61 v1(3339.64,1592.13)
  Bottom w11.81: v1(3339.64,1592.13) 3433.64,1498.13 3433.64,1259.13 3379.47,1204.96 3379.47,619.29 K1_Relay6.6@3515.64,483.13
RELAY_SET_Relay0: K1_Relay0.5 U9.15 | length 2771
  Top w11.81: U9.15@2886.59,1392.09 2887.11,1392.61 2925.12,1392.61 v1(2925.64,1393.13)
  Bottom w11.81: K1_Relay0.5@854.64,483.13 1051.74,483.13 1203.81,635.19 1203.81,1035.3 1281.64,1113.13 2731.27,1113.13 2925.64,1307.5 v1@2925.64,1392.14
RELAY_SET_Relay1: K1_Relay1.5 U9.13 | length 2547.9
  Top w11.81: U9.13@2886.59,1492.09 v1(2947.03,1492.09)
  Bottom w11.81: K1_Relay1.5@1247.64,483.13 1385.6,621.09 1385.6,975.09 1477.64,1067.13 2756.71,1067.13 2977.64,1288.06 2977.64,1461.48 v1(2947.03,1492.09)
RELAY_SET_Relay2: K1_Relay2.5 U9.11 | length 2316.9
  Top w11.81: U9.11@2886.59,1592.09 U9.11@2897.83,1592.09 ; U9.11@2896.83,1591.09 U9.11@2897.83,1592.09 ; v1(2947.03,1592.09) U9.11@2897.83,1592.09
  Bottom w11.81: K1_Relay2.5@1641.64,483.13 1777.43,618.92 1777.43,927.04 1873.51,1023.13 2788.45,1023.13 3030.8,1265.48 3030.8,1460.51 2947.03,1544.28 v1(2947.03,1592.09)
RELAY_SET_Relay3: K1_Relay3.5 U10.16 | length 1809.6
  Top w11.81: v1(3205.64,1341.13) U10.16@3243.95,1341.09
  Bottom w11.81: K1_Relay3.5@2034.64,483.13 2173.98,622.46 2173.98,912.46 2200.64,939.13 2931.64,939.13 3205.64,1213.13 v1(3205.64,1341.13)
RELAY_SET_Relay4: K1_Relay4.5 U10.14 | length 1579.2
  Top w11.81: U10.14@3243.95,1441.09 U10.14@3249.19,1441.09 ; U10.14@3252.93,1437.35 U10.14@3249.19,1441.09 ; v1(3304.38,1441.09) U10.14@3249.19,1441.09
  Bottom w11.81: K1_Relay4.5@2428.64,483.13 2566.67,621.16 2566.67,868.16 2613.64,915.13 2942.64,915.13 3304.38,1276.87 v1(3304.38,1441.09)
RELAY_SET_Relay5: K1_Relay5.5 U10.12 | length 1363.7
  Top w11.81: U10.12@3243.95,1541.09 v1(3304.38,1541.09)
  Bottom w11.81: K1_Relay5.5@2822.64,483.13 2961.76,622.24 2961.76,876.24 3359.64,1274.13 3359.64,1485.84 v1(3304.38,1541.09)
RELAY_SET_Relay6: K1_Relay6.5 U10.10 | length 1344
  Top w11.81: U10.10@3243.95,1641.09 v1(3304.38,1641.09)
  Bottom w11.81: K1_Relay6.5@3215.64,483.13 3352.62,620.1 3352.62,1207.8 3411.64,1266.82 3411.64,1483.24 3304.38,1590.5 v1(3304.38,1641.09)
RELAY_STS_Relay0: R10.1 R11.1 U11_Relay0.4 U11_Relay1.4 U11_Relay2.4 U11_Relay3.4 U11_Relay4.4 U11_Relay5.4 U11_Relay6.4 | length 3529
  Top w11.81: U11_Relay0.4@1082.64,1095.19 1082.64,1187.97 1105.84,1211.17 1499.58,1211.17 ; U11_Relay1.4@1475.58,1095.19 1475.58,1187.17 1499.58,1211.17 ; U11_Relay2.4@1872.75,1095.19 1872.75,1187.97 1895.95,1211.17 ; U11_Relay3.4@2259.75,1095.19 2259.75,1190.59 2280.33,1211.17 ; U11_Relay4.4@2649.75,1095.19 2649.75,1187.99 2672.93,1211.17 ; U11_Relay5.4@3034.75,1073.69 U11_Relay5.4@3034.75,1095.19 3034.75,1187.3 3058.61,1211.17 ; R11.1@3612.45,880.02 R10.1@3570.64,880.02 3541.8,880.02 3429.75,992.07 U11_Relay6.4@3429.75,1095.19 3429.75,1181.01 3399.6,1211.17 3058.61,1211.17 ; 1499.58,1211.17 2280.33,1211.17 ; 2280.33,1211.17 2665.95,1211.17 2672.93,1211.17 ; 2672.93,1211.17 3050.95,1211.17 3058.61,1211.17
RELAY_STSN_Relay0: U5.15 U11_Relay0.3 | length 2937.4
  Top w11.81: U11_Relay0.3@1132.64,1095.19 v1(1132.64,1168.63) ; U5.15@2889.94,2316.29 U5.15@2891.02,2315.21 ; U5.15@2890.48,2315.75 v1(2950.91,2315.75)
  Bottom w11.81: v1(1132.64,1168.63) 1231.33,1267.32 2671.85,1267.32 2815.16,1410.62 2815.16,2278.75 2852.15,2315.75 v1(2950.91,2315.75)
RELAY_STSN_Relay1: U5.14 U11_Relay1.3 | length 2607.2
  Top w11.81: v1(1524.75,1168.63) U11_Relay1.3@1524.75,1095.19 1524.75,1074.53 U11_Relay1.3@1525.58,1073.69 ; U5.14@2890.02,2366.21 U5.14@2889.94,2366.29 v1(2950.37,2366.29)
  Bottom w11.81: v1(1524.75,1168.63) 1600.4,1244.28 2685.44,1244.28 2834.82,1393.65 2834.82,2011.9 2983.62,2160.7 2983.62,2333.05 v1(2950.37,2366.29)
RELAY_STSN_Relay2: U5.13 U11_Relay2.3 | length 2278.9
  Top w11.81: U11_Relay2.3@1922.75,1095.19 v1(1922.75,1168.63) ; U5.13@2891.52,2414.71 U5.13@2889.94,2416.29 v1(2950.37,2416.29)
  Bottom w11.81: v1(1922.75,1168.63) 1976.31,1222.18 2701.56,1222.18 2855.64,1376.26 2855.64,2002.74 3004.28,2151.38 3004.28,2362.38 v1(2950.37,2416.29)
RELAY_STSN_Relay3: U5.12 U11_Relay3.3 | length 2003.2
  Top w11.81: v1(2309.75,1168.63) U11_Relay3.3@2309.75,1095.19 2309.75,1074.53 U11_Relay3.3@2310.58,1073.69 ; U5.12@2889.94,2466.29 v1(2950.37,2466.29)
  Bottom w11.81: v1(2309.75,1168.63) 2340.5,1199.38 2717.65,1199.38 2876.64,1358.37 2876.64,1994.68 3027.04,2145.08 3027.04,2389.62 v1(2950.37,2466.29)
RELAY_STSN_Relay4: U5.11 U11_Relay4.3 | length 1686.4
  Top w11.81: U11_Relay4.3@2700.58,1095.19 v1(2700.58,1168.63) ; U5.11@2889.94,2516.29 U5.11@2892.5,2518.85 ; U5.11@2892.5,2516.85 v1(2952.93,2516.85)
  Bottom w11.81: v1(2700.58,1168.63) 2728.56,1168.63 2896.64,1336.7 2896.64,1983.98 3049.2,2136.54 3049.2,2420.58 v1(2952.93,2516.85)
RELAY_STSN_Relay5: U5.10 U11_Relay5.3 | length 1837.4
  Top w11.81: U5.10@2889.94,2566.29 2822.03,2566.29 2791.64,2535.9 2791.64,1332.9 2854.51,1270.03 v1@3105.64,1270.03 ; U11_Relay5.3@3084.75,1095.19 v1(3084.75,1168.63)
  Bottom w11.81: v1(3084.75,1168.63) 3105.64,1189.51 v1@3105.64,1269.96
  other v1: 3106.25,1270.03
RELAY_STSN_Relay6: U5.9 U11_Relay6.3 | length 2236.7
  Top w11.81: U5.9@2889.94,2616.29 2824.78,2616.29 2767.89,2559.4 2767.89,1319.24 2846.63,1240.5 3414.26,1240.5 3478.64,1176.13 U11_Relay6.3@3478.64,1095.19
RLY_R0: U6.2 U9.1 | length 711.6
  Top w11.81: v1(3046.89,1898.38) U6.2@3108.05,1898.38 ; U9.1@3114.99,1342.11 v1(3161.64,1342.13)
  Bottom w8: v1(3046.89,1898.38) 3046.89,1572.75 3100.79,1518.85 3100.79,1402.97 v1(3161.64,1342.13)
RLY_R1: U7.6 U9.3 | length 896.4
  Top w8: v1(3378.11,2096.8) 3442.5,2096.8 U7.6@3444.07,2098.38
  Top w11.81: U9.3@3112.97,1441.09 v1(3181.08,1441.09)
  Bottom w8: v1(3181.08,1441.09) 3181.08,1578.29 3151.64,1607.73 3151.64,1781.99 3378.11,2008.46 v1(3378.11,2096.8)